# Altium PCB DRV8231_Breakout_Board.PcbDoc
Units mil, origin at the board's own origin, x right, y up, seen from the top; angles counter-clockwise.
Board outline 1302 x 1018 mil, 2 copper layers (Top Layer, Bottom Layer), stack 61.811 mil thick; 15 components, 14 nets, 59 pads, 66 vias.
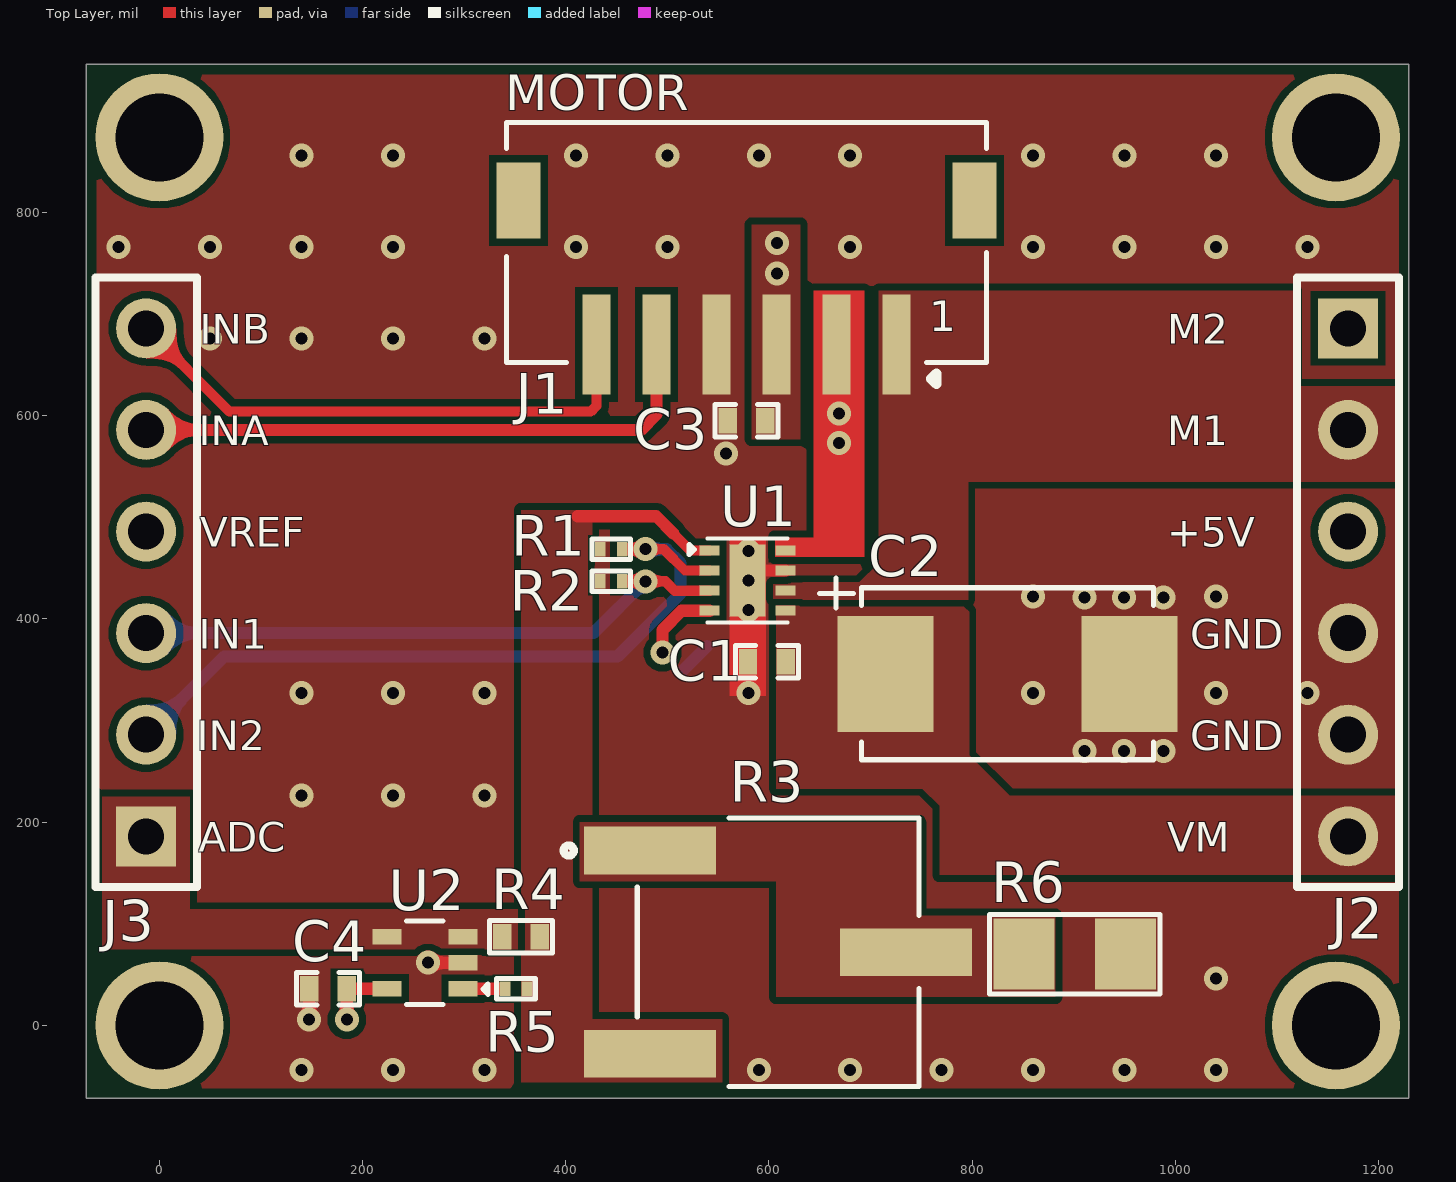
[diagram p0: Top Layer view]
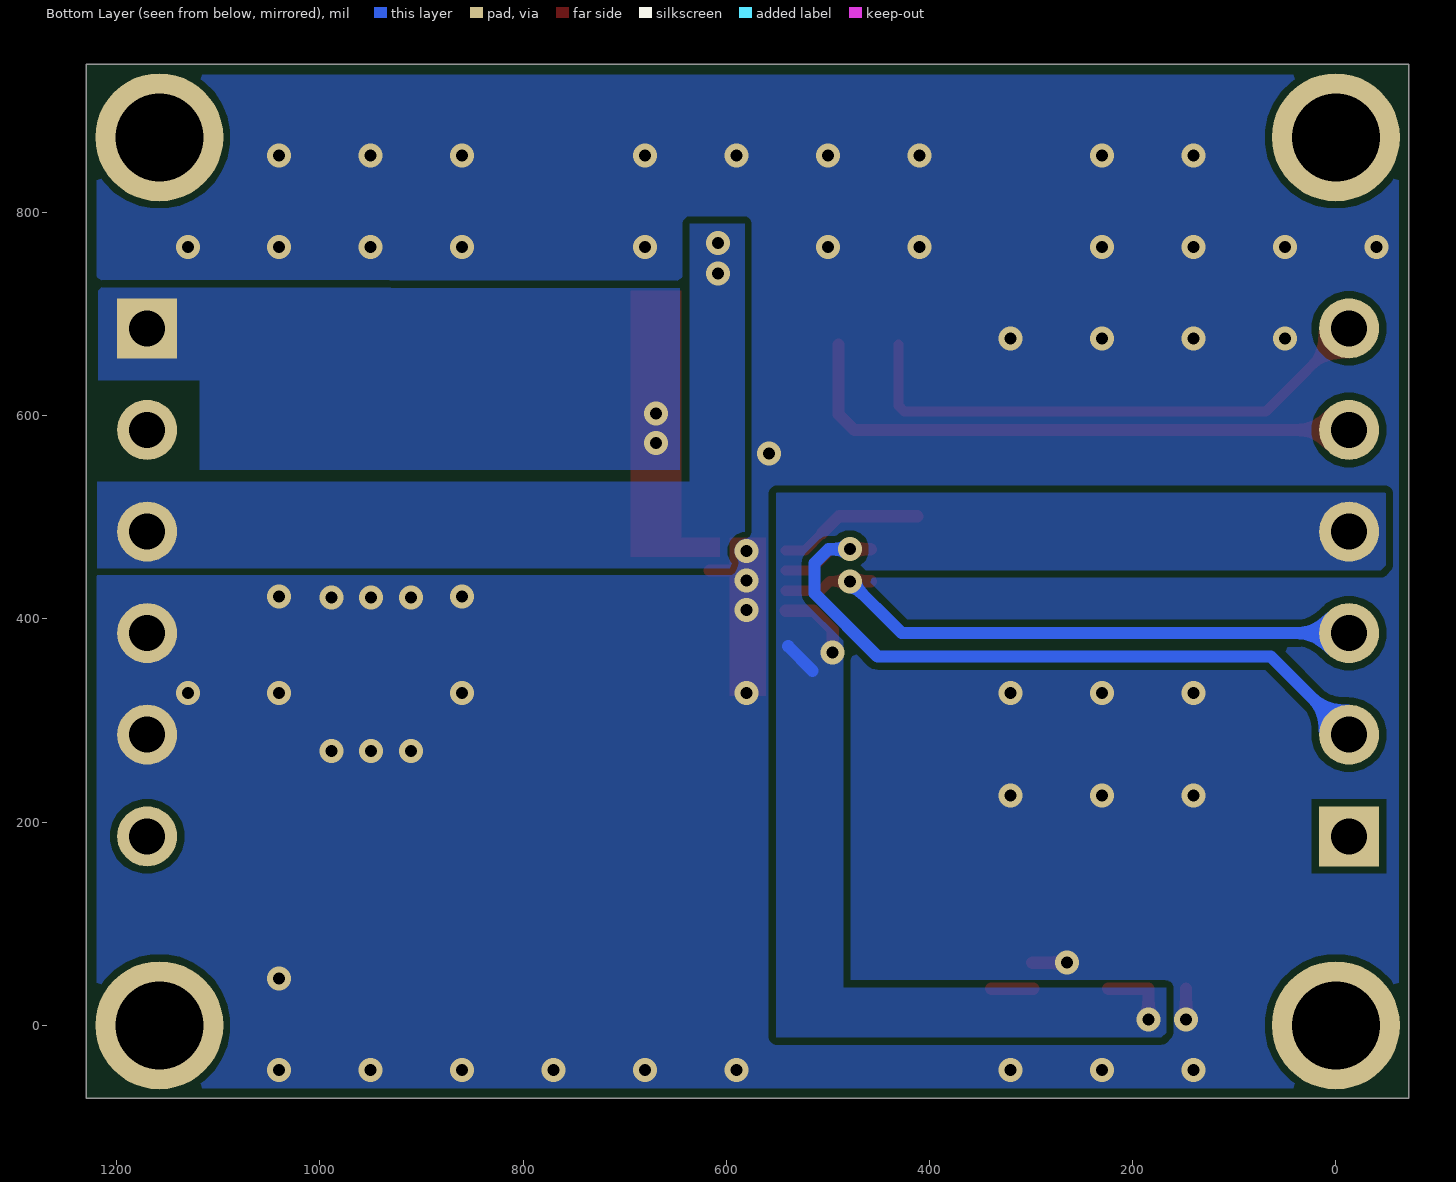
[diagram p1: Bottom Layer view, seen from below]
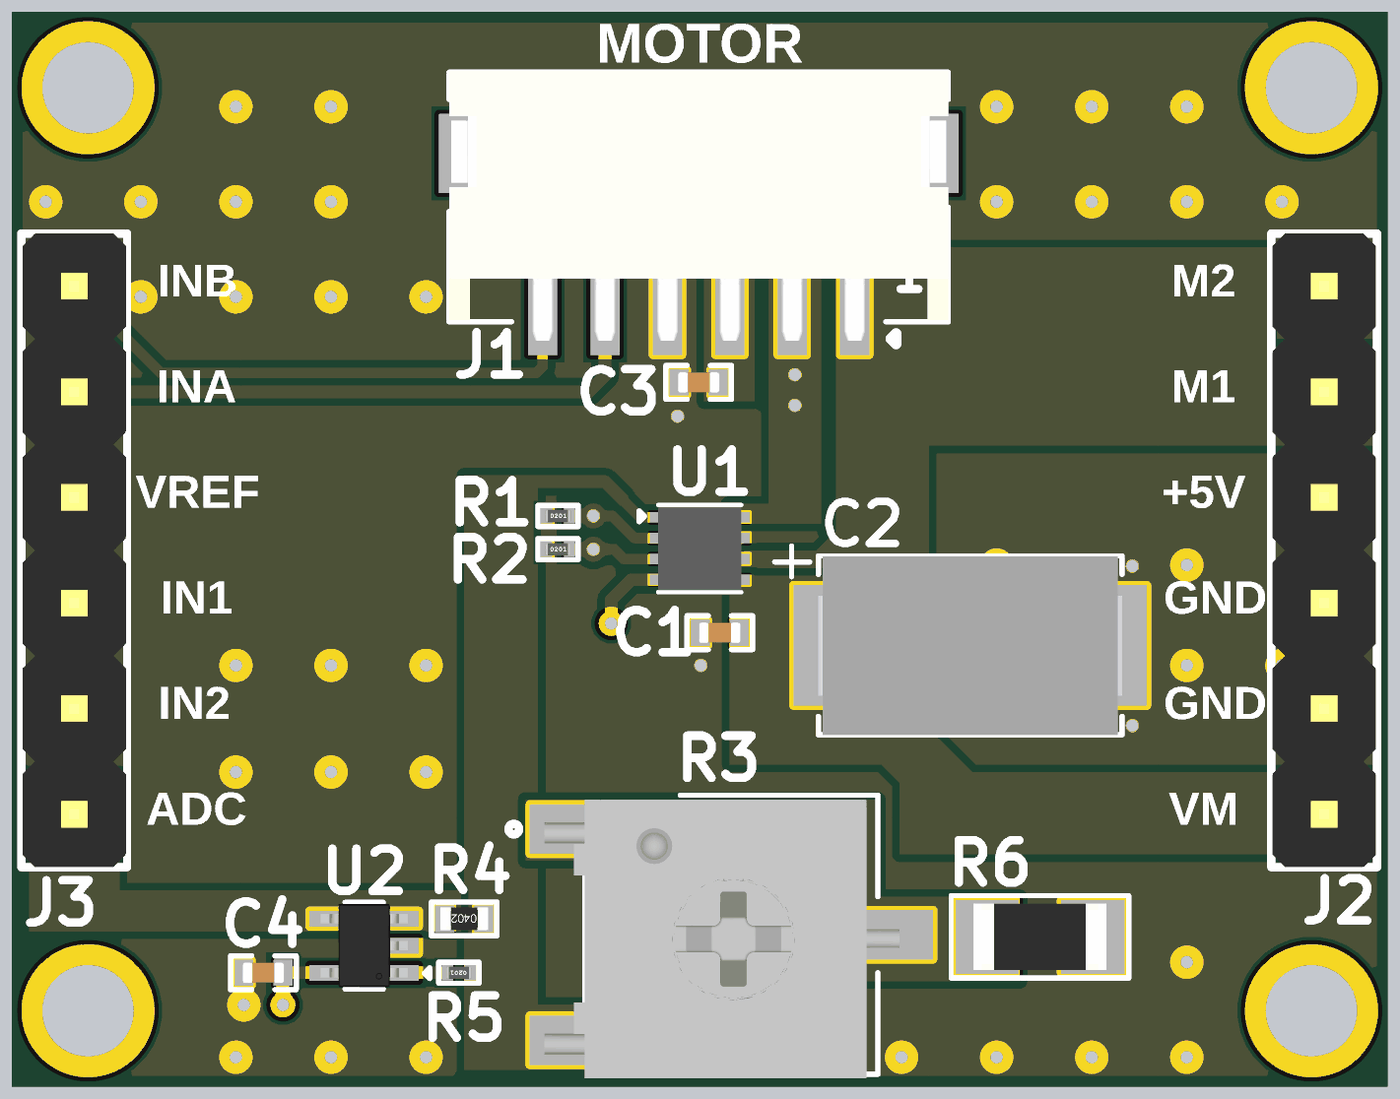
[diagram p2: 3D render of the assembled board from above, using the file's embedded part models]

## Layer stack, top to bottom
Top Solder: solder mask 0.394, Solder Resist, Dk 3.5
Top Layer: signal copper 1.378
Dielectric 1: dielectric 59.055, FR-4, Dk 4.8
Bottom Layer: signal copper 1.378
Bottom Solder: solder mask 0.394, Solder Resist, Dk 3.5

## Board outline
-72,-72 1230,-72 1230,946 -72,946

## Design rules (kind name [scope] priority, off if disabled: settings)
BoardOutlineClearance [All] p1: gap=0 ignorepadtopadclearanceinfootprint=FALSE except(10: Poly-OutlineEdge)
Clearance [All] p1: gap=7 ignorepadtopadclearanceinfootprint=FALSE except(0: Arc-Hole Track-Hole SMDPad-Hole THPad-Hole Via-Hole Fill-Hole Poly-Hole Region-Hole Text-Hole; 4: Arc-SMDPad Track-SMDPad SMDPad-SMDPad)
MinimumSolderMaskSliver [All] p1: minsoldermaskwidth=0
PolygonConnect [All] p1: connectstyle=Direct reliefconductorwidth=10 reliefentries=4 polygonreliefangle="90 Angle" airgapwidth=10
RoutingVias [All] p1: holewidth=11.81 width=23.62 viastyle="Through Hole" minholewidth=11.81 minwidth=23.62 maxholewidth=11.81 maxwidth=23.62
SilkToSilkClearance [All] p1: silktosilkclearance=0
SilkToSolderMaskClearance [IsPad] p1: minsilkscreentomaskgap=0 clearancetoexposedcopper=TRUE
SolderMaskExpansion [All] p1: expansion=4 istentingtop=FALSE
UnRoutedNet [All] p1: checkbadconnections=TRUE
Width [All] p1: maxlimit=100 minlimit=10 preferedwidth=22
26 further rules are at their usual default settings.

## Classes and differential pairs
component class Breakout: C1 C2 C3 J1 J2 J3 R1 R2 R4 R5 U1 U2

## Components (designator, comment, footprint, x,y, rotation, side; value= is the part's Value field where it differs from the comment)
C1 "0.1uf" Cap-0402 598,358 r0 top
C2 "47uF" Case-D 835,346 r0 top
C3 "0.1uf" Cap-0402 578,595 r0 top locked
C4 "0.1uf" Cap-0402 166,36 r0 top locked
J1 "S6B-ZR-SM4A-TF(LF)(SN)" S6B-ZR-SM4A-TF(LF)(SN) 578,741 r180 top locked
J2 "C37208" HDR1X6_ 1170,686 r270 top locked
J3 "C37208" HDR1X6_ -13,186 r90 top locked
R1 "100K" Res-0201 444.87,468.56 r0 top locked
R2 "100K" Res-0201 444.83,437 r0 top locked
R3 "5k" 3361P-1-502GLF 609,72 r0 top locked value=5kR
R4 "DNP" Res-0402 356,87 r180 top locked value=0R
R5 "4.7K" Res-0201 351,36 r180 top locked
R6 "720mR" Res-1206 901,70 r180 top locked
U1 "DRV8231ADSGR" WSON-8(2x2) 579,437.65 r0 top locked
U2 "TLV9001IDCKR" SC-70-5 261.4,61.59 r180 top locked

## Footprints (in the part's own frame and the unit in brackets; to place one, negate y for a bottom-side part, rotate by r counter-clockwise, add the part's x,y. Pads: shape width x height; smd on the part's side, far side on the other; paste and mask are expansions set on the pad)
3361P-1-502GLF [mm]
  rect 3.3x1.19 smd: 1(-3.2,2.54) 2(3.2,0) 3(-3.2,-2.54)
  silkscreen extent -5.36,-3.35 3.52,3.35, body extent -4.5,-3.46 4.04,3.25, height 5.23
Cap-0402 [mil]
  rect 18x25 smd mask+2.36: 1(-18.5,0) 2(18.5,0)
  silkscreen extent -31,-16 31,16, body extent -20,-10 20,10, height 19
Case-D [mm]
  rect 2.4x2.9 smd: 1(-3.05,0) 2(3.05,0)
  silkscreen extent -4.7,-2.15 3.65,2.39, body extent -3.65,-2.16 3.65,2.14, height 4
HDR1X6_ [mm] "Connector; Header; 6 Position"
  rect 1.5x1.5 hole 0.9: 1(0,0)
  round 1.5 hole 0.9: 2(2.54,0) 3(5.08,0) 4(7.62,0) 5(10.16,0) 6(12.7,0)
  silkscreen extent -1.27,-1.27 13.97,1.27, body extent -1.27,-1.24 13.97,1.25, height 8.54
Res-0201 [mm]
  rect 0.27x0.37 smd mask+0.055: 1(-0.275,0) 2(0.275,0)
  silkscreen extent -0.48,-0.25 0.48,0.25, body extent -0.3,-0.15 0.3,0.15, height 0.29
Res-0402 [mil]
  rect 18x25 smd mask+2.17: 1(-18.5,0) 2(18.5,0)
  silkscreen extent -32,-17 32,16, body extent -23,-11 23,11, height 16
Res-1206 [mil]
  rect 60x70 smd: 1(-50,0) 2(50,0)
  silkscreen extent -84,-39 84,39, body extent -63,-31 63,31, height 24
S6B-ZR-SM4A-TF(LF)(SN) [mm]
  rect 0.7x2.5 smd: 1(-3.75,1.8) 2(-2.25,1.8) 3(-0.75,1.8) 4(0.75,1.8) 5(2.25,1.8) 6(3.75,1.8)
  rect 1.1x1.9 smd: MP1(-5.7,-1.8) MP2(5.7,-1.8)
  silkscreen extent -6,-3.75 6,2.79, body extent -6,-3.79 6,2.71, height 3.7
SC-70-5 [mm]
  rect 0.73x0.38 smd: 1(-0.95,0.65) 2(-0.95,0) 3(-0.95,-0.65) 4(0.95,-0.65) 5(0.95,0.65)
  silkscreen extent -1.57,-1.04 0.46,1.04, body extent -1.05,-1 1.05,1, height 0.95
WSON-8(2x2) [mm]
  rect 0.5x0.25 smd paste+0 mask+0.051: 1(-0.949,0.751) 2(-0.951,0.252) 3(-0.95,-0.251) 4(-0.951,-0.751) 5(0.951,-0.751) 6(0.951,-0.249) 7(0.951,0.251) 8(0.951,0.75)
  rect 0.9x1.8 smd paste+0 mask+0.051: 9(0,0)
  silkscreen extent -1.46,-1.05 1,1.05, body extent -1,-1 1,1, height 0.77

## Part data
C1 C3 C4: library part GRM155R62A104KE14D, "CAP CER 0.1UF 100V X5R 0402", Capacitance=100nF, Case Code (Imperial)=0402, Case Code (Metric)=1005, Dielectric=X5R, LCSC Part Number=C162178, Manufacturer=Murata, Max Operating Temperature=85°C, Min Operating Temperature=-55°C, Package Quantity=10000, Tolerance=10%, Voltage Rating=100V, Case/Package=0402, Category="Ceramic Capacitors", ComponentLink1Description=http://www.farnell.com/datasheets/2079151.pdf?src-supplier=Farnell, ComponentLink1URL=http://www.farnell.com/datasheets/2079151.pdf?src-supplier=Farnell, ComponentLink2Description=http://www.mouser.com/ds/2/281/c02e-2905.pdf?src-supplier=Mouser, ComponentLink2URL=http://www.mouser.com/ds/2/281/c02e-2905.pdf?src-supplier=Mouser, ComponentLink3Description=http://www.farnell.com/datasheets/2079151.pdf?src-supplier=Element14, ComponentLink3URL=http://www.farnell.com/datasheets/2079151.pdf?src-supplier=Element14, ComponentLink4Description=http://search.murata.co.jp/Ceramy/image/img/A01X/G101/ENG/GRM155R62A104KE14-01.pdf?src-supplier=Digi-Key, ComponentLink4URL=http://search.murata.co.jp/Ceramy/image/img/A01X/G101/ENG/GRM155R62A104KE14-01.pdf?src-supplier=Digi-Key, ComponentLink5Description=http://www.farnell.com/datasheets/2079151.pdf?src-supplier=Newark, ComponentLink5URL=http://www.farnell.com/datasheets/2079151.pdf?src-supplier=Newark, Height=0.5mm, Item Type=Capacitor, Lead Free="Lead Free", Length=0.039inch, Manufacturer Part Number=GRM155R62A104KE14D, Mount="Surface Mount", Packaging="Tape and Reel", Pricing 1="10000=0.00500, 20000=0.00410, 30000=0.00390, 50000=0.00370, 100000=0.00300 (USD)", Reach SVHC Compliant=Yes, RoHS=Yes, RoHS Compliant=Yes, Series=GRM, Stock 1=870000, Supplier 1="Arrow Electronics", Supplier Part Number 1=GRM155R62A104KE14D, Termination=SMD/SMT, Thickness=0.022inch, Voltage Rating (DC)=100V, Weight=0.000212oz, Width=0.02inch
C2: library part CA45-D025K476T, "47uF 25V 0.9Ω@100kHz ±10% CASE-D-7343 Tantalum Capacitors ROHS", LCSC Part Number=C123267, Manufacturer="Hunan Xiangyee in S&T", Package=CASE-D-7343, ComponentLink1Description=LCSC, ComponentLink1URL=https://www.lcsc.com/product-detail/Tantalum-Capacitors_Hunan-Xiangyee-in-S-T-CA45-D025K476T_C123267.html, Item Type=Capacitor, Manufacturer Part Number=CA45-D025K476T
J1: "CONN HEADER SMD R/A 6POS 1.5MM", LCSC Part Number=C265070, Manufacturer=JST, Category="Headers and Wire Housings", ComponentLink1Description=https://datasheet.ciiva.com/26894/getdatasheetpartid-724069-26894934.pdf?src-supplier=Verical, ComponentLink1URL=https://datasheet.ciiva.com/26894/getdatasheetpartid-724069-26894934.pdf?src-supplier=Verical, ComponentLink2Description=https://datasheet.ciiva.com/26924/getdatasheetpartid-640743-26924052.pdf?src-supplier=Verical, ComponentLink2URL=https://datasheet.ciiva.com/26924/getdatasheetpartid-640743-26924052.pdf?src-supplier=Verical, Item Type="Wire To Board Connector", Manufacturer Part Number=S6B-ZR-SM4A-TF(LF)(SN), Pricing="1000=0.4135, 2000=0.3766, 5000=0.3642, 10000=0.3395, 25000=0.3272, 50000=0.327 (USD)", RoHS=Yes, Stock=49000, Supplier="Arrow Electronics", Supplier Part Number=S6B-ZR-SM4A-TF(LF)(SN)
J2 J3: "Straight 1 6 2.54mm Black Brass Plugin,P=2.54mm Pin Headers ROHS", Manufacturer=BOOMELEC, Package=Custom, ComponentLink1Description="New link", ComponentLink1URL=https://www.lcsc.com/product-detail/Pin-Headers_BOOMELE-Boom-Precision-Elec-C37208_C37208.html, Item Type=Header, LCSC Part Number=C37208, Manufacturer Part Number=C37208
R1 R2: library part RC0201JR-07100KL, "RES SMD 100K OHM 5% 1/20W 0201", Case Code (Imperial)=0201, Case Code (Metric)=0603, LCSC Part Number=C106230, Manufacturer=Yageo, Max Operating Temperature=125°C, Max Power Dissipation=50mW, Min Operating Temperature=-55°C, Package Quantity=1, Resistance=100kR, Resistance Tolerance=5%, Resistor Type="Thick Film", Temperature Coefficient=200ppm/°C, Voltage Rating=25V, Case/Package=0201, Category="Chip SMD Resistors", ComponentLink1Description=https://datasheet.ciiva.com/2462/pyu-r-int-thick-7-2462817.pdf?src-supplier=Digi-Key, ComponentLink1URL=https://datasheet.ciiva.com/2462/pyu-r-int-thick-7-2462817.pdf?src-supplier=Digi-Key, ComponentLink2Description=https://datasheet.ciiva.com/2462/pyu-r-int-thick-7-2462818.pdf?src-supplier=Digi-Key, ComponentLink2URL=https://datasheet.ciiva.com/2462/pyu-r-int-thick-7-2462818.pdf?src-supplier=Digi-Key, ComponentLink3Description=https://datasheet.ciiva.com/2462/pyu-r-int-thick-7-2462819.pdf?src-supplier=Digi-Key, ComponentLink3URL=https://datasheet.ciiva.com/2462/pyu-r-int-thick-7-2462819.pdf?src-supplier=Digi-Key, ComponentLink4Description=https://datasheet.ciiva.com/8888/pyu-rc0201-51-rohs-l-8-8888005.pdf?src-supplier=Avnet, ComponentLink4URL=https://datasheet.ciiva.com/8888/pyu-rc0201-51-rohs-l-8-8888005.pdf?src-supplier=Avnet, ComponentLink5Description=https://datasheet.ciiva.com/8896/pyu-rc0201-51-rohs-l-8-8896213.pdf?src-supplier=Avnet, ComponentLink5URL=https://datasheet.ciiva.com/8896/pyu-rc0201-51-rohs-l-8-8896213.pdf?src-supplier=Avnet, ComponentLink6Description=https://datasheet.ciiva.com/28395/pyu-rc0201-51-rohs-l-8-28395542.pdf?src-supplier=Avnet+Europe, ComponentLink6URL=https://datasheet.ciiva.com/28395/pyu-rc0201-51-rohs-l-8-28395542.pdf?src-supplier=Avnet+Europe, ComponentLink7Description=https://datasheet.ciiva.com/28639/1421516-28639863.pdf?src-supplier=Element14, ComponentLink7URL=https://datasheet.ciiva.com/28639/1421516-28639863.pdf?src-supplier=Element14, ComponentLink8Description=https://datasheet.ciiva.com/7672/1563626-7672249.pdf?src-supplier=Element14, ComponentLink8URL=https://datasheet.ciiva.com/7672/1563626-7672249.pdf?src-supplier=Element14, ComponentLink9Description=https://datasheet.ciiva.com/7672/1563626-7672250.pdf?src-supplier=Element14, ComponentLink9URL=https://datasheet.ciiva.com/7672/1563626-7672250.pdf?src-supplier=Element14, Construction=Rectangular, Contact Plating=Tin,Matte, Depth=0.3mm, Features="Moisture Resistant", Height=0.01inch, Lead Free="Lead Free", Length=0.6mm, Manufacturer Part Number=RC0201JR-07100KL, Military Standard=Not, Number of Terminations=2, Packaging="Tape and Reel", Power Rating=50mW, Pricing 1="1=0.09240, 10=0.09140, 25=0.05450, 10000=0.00340, 100000=0.00320, 1000000=0.00180, 5000000=0.00110 (USD)", Radiation Hardening=No, REACH SVHC="No SVHC", RoHS=Yes, RoHS Compliant=Yes, Series=RC, Size Code=0201, Stock 1=76, Supplier 1="Arrow Electronics", Supplier Part Number 1=RC0201JR-07100KL, Termination=SMD/SMT, Tolerance=5%, Voltage Rating (DC)=25V, Weight=6E-06oz, Width=0.012inch
R3: library part 3361P-1-502GLF, "Resistor Cermet Trimmer 5K Ohm 10% 1/2W 1(Elec)/1(Mech)Turn 2.77mm Gull Wing SMD Embossed T/R", Manufacturer=Bourns, Max Operating Temperature=125°C, Max Power Dissipation=500mW, Min Operating Temperature=-55°C, Package Quantity=1, Resistance Tolerance=10%, Resistor Type=Cermet, Supplier Part Number=3361P-502GLFCT-ND, Temperature Coefficient=100ppm/°C, Voltage Rating=300V, Category="Variable Resistors and Potentiometers", ComponentLink1Description=https://datasheet.ciiva.com/6197/1443095-6197504.pdf?src-supplier=Farnell, ComponentLink1URL=https://datasheet.ciiva.com/6197/1443095-6197504.pdf?src-supplier=Farnell, ComponentLink2Description=https://datasheet.ciiva.com/27056/2033666-27056369.pdf?src-supplier=Jameco, ComponentLink2URL=https://datasheet.ciiva.com/27056/2033666-27056369.pdf?src-supplier=Jameco, ComponentLink3Description=https://datasheet.ciiva.com/11833/0900766b80fe1d0c-11833209.pdf?src-supplier=Rs, ComponentLink3URL=https://datasheet.ciiva.com/11833/0900766b80fe1d0c-11833209.pdf?src-supplier=Rs, ComponentLink4Description=https://datasheet.ciiva.com/1477/1846252-1477777.pdf?src-supplier=Element14, ComponentLink4URL=https://datasheet.ciiva.com/1477/1846252-1477777.pdf?src-supplier=Element14, ComponentLink5Description=https://datasheet.ciiva.com/1477/1846252-1477776.pdf?src-supplier=Element14, ComponentLink5URL=https://datasheet.ciiva.com/1477/1846252-1477776.pdf?src-supplier=Element14, ComponentLink6Description=https://datasheet.ciiva.com/28666/1733537-28666333.pdf?src-supplier=Element14, ComponentLink6URL=https://datasheet.ciiva.com/28666/1733537-28666333.pdf?src-supplier=Element14, ComponentLink7Description=https://datasheet.ciiva.com/3266/3361-3266693.pdf?src-supplier=Avnet, ComponentLink7URL=https://datasheet.ciiva.com/3266/3361-3266693.pdf?src-supplier=Avnet, ComponentLink8Description=https://datasheet.ciiva.com/2156/3361-2156181.pdf?src-supplier=Digikey, ComponentLink8URL=https://datasheet.ciiva.com/2156/3361-2156181.pdf?src-supplier=Digikey, ComponentLink9Description=https://datasheet.ciiva.com/2156/3361-2156179.pdf?src-supplier=Digikey, ComponentLink9URL=https://datasheet.ciiva.com/2156/3361-2156179.pdf?src-supplier=Digikey, ComponentLink10Description=https://datasheet.ciiva.com/15225/getdatasheetpartid-162034-15225196.pdf?src-supplier=Verical, ComponentLink10URL=https://datasheet.ciiva.com/15225/getdatasheetpartid-162034-15225196.pdf?src-supplier=Verical, ComponentLink11Description=https://datasheet.ciiva.com/3266/3361-3266694.pdf?src-supplier=Avnet, ComponentLink11URL=https://datasheet.ciiva.com/3266/3361-3266694.pdf?src-supplier=Avnet, ComponentLink12Description=https://datasheet.ciiva.com/2156/3361-2156180.pdf?src-supplier=Digikey, ComponentLink12URL=https://datasheet.ciiva.com/2156/3361-2156180.pdf?src-supplier=Digikey, ComponentLink13Description=https://datasheet.ciiva.com/16716/70153632-16716878.pdf?src-supplier=Allied+Electronics, ComponentLink13URL=https://datasheet.ciiva.com/16716/70153632-16716878.pdf?src-supplier=Allied+Electronics, Depth=8.53mm, Height=0.192inch, Length=6.71mm, Manufacturer Part Number=3361P-1-502GLF, Military Standard=Not, Mounting Technology="Surface Mount", Number of Turns=1, Packaging="Tape and Reel", Power Rating=500mW, Pricing="1=1.27, 10=1.121, 25=1.0088, 50=0.9716, 100=0.9342, 250=0.8782 (USD)", Radiation Hardening=No, Reach SVHC Compliant=No, RoHS=Yes, RoHS Compliant=Yes, Series="Trimpot® 3361 - Sealed", Stock=12713, Supplier=Digikey, Taper=Linear, Technology=CERMET, Termination="Gull Wing", Tolerance=10%, Voltage Rating (DC)=300V, Weight=0.567g, Width=0.264inch
R4: library part AC0402FR-070RL, "RESISTOR 0402 JUMPER ZERO OHM", Case Code (Imperial)=0402, Case Code (Metric)=1005, LCSC Part Number=C226739, Manufacturer=Yageo, Max Operating Temperature=155°C, Min Operating Temperature=-55°C, Power Rating=62.5mW, Supplier Part Number=13-AC0402FR-070RLDKR-ND, Temperature Coefficient=200ppm/°C, Tolerance=1%, Voltage Rating=50V, Case/Package=0402, Category="Chip SMD Resistors", ComponentLink1Description=https://datasheet.ciiva.com/12656/pyu-ac-51-rohs-l-2-12656734.pdf?src-supplier=Mouser, ComponentLink1URL=https://datasheet.ciiva.com/12656/pyu-ac-51-rohs-l-2-12656734.pdf?src-supplier=Mouser, ComponentLink2Description=LCSC, ComponentLink2URL=https://www.lcsc.com/product-detail/Chip-Resistor-Surface-Mount_YAGEO-AC0402FR-070RL_C226739.html, Height=370um, Item Type=Resistor, Manufacturer Part Number=AC0402FR-070RL, Packaging="Tape and Reel", Pricing="1=0.1, 10=0.017, 25=0.0132, 50=0.01, 100=0.0071, 250=0.00568, 500=0.00454, 1000=0.00335, 5000=0.0024 (USD)", RoHS=Yes, Series=AC, Stock=337140, Supplier=Digi-Key, Termination=SMD/SMT
R5: library part RC0201FR-074K7L, "RES 4.7K OHM 1% 1/20W 0201", LCSC Part Number=C138135, Manufacturer=Yageo, Supplier Part Number=7537285, Category="Chip SMD Resistors", ComponentLink1Description=https://datasheet.ciiva.com/2493/pyu-r-int-thick-7-2493811.pdf?src-supplier=Digi-Key, ComponentLink1URL=https://datasheet.ciiva.com/2493/pyu-r-int-thick-7-2493811.pdf?src-supplier=Digi-Key, ComponentLink2Description=https://datasheet.ciiva.com/2493/pyu-r-int-thick-7-2493812.pdf?src-supplier=Digi-Key, ComponentLink2URL=https://datasheet.ciiva.com/2493/pyu-r-int-thick-7-2493812.pdf?src-supplier=Digi-Key, ComponentLink3Description=https://datasheet.ciiva.com/2493/pyu-r-int-thick-7-2493813.pdf?src-supplier=Digi-Key, ComponentLink3URL=https://datasheet.ciiva.com/2493/pyu-r-int-thick-7-2493813.pdf?src-supplier=Digi-Key, ComponentLink4Description=https://datasheet.ciiva.com/8892/pyu-rc0201-51-rohs-l-8-8892942.pdf?src-supplier=Avnet, ComponentLink4URL=https://datasheet.ciiva.com/8892/pyu-rc0201-51-rohs-l-8-8892942.pdf?src-supplier=Avnet, ComponentLink5Description=https://datasheet.ciiva.com/7672/1563626-7672233.pdf?src-supplier=Element14, ComponentLink5URL=https://datasheet.ciiva.com/7672/1563626-7672233.pdf?src-supplier=Element14, Item Type=Resistor, Manufacturer Part Number=RC0201FR-074K7L, Pricing="10000=0.0014, 50000=0.0013, 250000=0.0013, 750000=0.0012, 2000000=0.0011 (USD)", RoHS=Yes, Stock=1610000, Supplier="Future Electronics"
R6: library part CR1206FR720P05R, "250mW 720mΩ ±600ppm/℃ ±1% 1206 Current Sense Resistors/Shunt Resistors ROHS", LCSC Part Number=C175810, Manufacturer="Ever Ohms Tech", Package=1206, ComponentLink1Description=LCSC, ComponentLink1URL=https://www.lcsc.com/product-detail/Current-Sense-Resistors-Shunt-Resistors_Ever-Ohms-Tech-CR1206FR720P05R_C175810.html, Item Type=Resistor, Manufacturer Part Number=CR1206FR720P05R
U1: "33V H BRIDGE MOTOR DRIVER WITH C", LCSC Part Number=C5139865, Manufacturer="Texas Instruments", Supplier Part Number=595-DRV8231ADSGR, Height=800um, Item Type=IC, Length=2mm, Manufacturer Part Number=DRV8231ADSGR, Number of Channels=1NUMBER, Pins=8NUMBER, Pricing="1=1.52, 10=1.29, 50=1.29, 100=1.1, 1000=0.747, 10000=0.657 (USD)", RoHS=No, Stock=8609, Supplier=Mouser, Thickness=750um, Width=2mm
U2: "IC CMOS 1 CIRCUIT SC70-5", Input Bias Current=5pA, Input Offset Voltage (Vos)=400uV, LCSC Part Number=C398362, Manufacturer="Texas Instruments", Max Operating Temperature=125°C, Min Operating Temperature=-40°C, Operating Supply Current=60uA, Output Current per Channel=40mA, Supplier Part Number=595-TLV9001IDCKR, ComponentLink1Description=http://www.ti.com/lit/ds/symlink/tlv9001.pdf?src-supplier=Digikey, ComponentLink1URL=http://www.ti.com/lit/ds/symlink/tlv9001.pdf?src-supplier=Digikey, Gain Bandwidth Product=1MHz, Item Type=IC, Manufacturer Part Number=TLV9001IDCKR, Mounting Technology="Surface Mount", Number of Channels=1, Number of Circuits=1, Packaging="Cut Tape", Pricing="1=0.47, 10=0.348, 50=0.348, 100=0.194, 1000=0.146, 10000=0.117 (USD)", RoHS=Yes, RoHS Compliant=Yes, Series=-, Slew Rate=2V/µs, Stock=13115, Supplier=Mouser

## Free pads (board coordinates)
  round 125.98 hole 86.61: MH(0,874) MH(0,0) MH(1158,874) MH(1158,0)

## Via types
v1: diameter 23.62, hole 11.81, Top Layer to Bottom Layer, 66 vias

## Nets (pads, with @x,y where several pads share a name; then routed paths per layer and width w, separated by ;. In a path a pad name is that pad's centre, name@x,y a point inside that pad or via, vN(x,y) a via of type N, cw(c..) or ccw(c..) an arc to the next point about the centre after c; other vN are vias at no path point)
+5V: C3.2 J1.3 J2.3
  other v1: 608,740 608,770
ADC: J3.1 R4.2 U2.3 U2.4
GND: C1.1 C2.2 C3.1 C4.1 J1.4 J2.4 J2.5 R1.1 R2.1 R6.1 U1.7 U1.9 U2.2 | length 106.4
  Top Layer w12: v1(147.5,5.5) C4.1 ; v1(264.41,61.59) U2.2 ; U1.9 588.88,447.53 U1.7
  other v1: 140,-44 230,-44 320,-44 590,-44 680,-44 770,-44 860,-44 950,-44 1040,-44 1040,46 140,226 230,226 320,226 910.5,270 949.5,270 988.5,270 140,327 230,327 320,327 580,327 860,327 1040,327 1130,327 580,409 910.5,421 949.5,421 988.5,421 860,422 1040,422 580,438 580,467 558,563 50,676 140,676 230,676 320,676 -40,766 50,766 140,766 230,766 410,766 500,766 680,766 860,766 950,766 1040,766 1130,766 140,856 230,856 410,856 500,856 590,856 680,856 860,856 950,856 1040,856
I_SENSE: R3.3 R4.1 R5.1 U1.1 | length 143.8
  Top Layer w10: 505.89,484.11 522.77,467.23 U1.1
  Top Layer w12: 411.83,501 489,501 505.89,484.11
IN1: J3.3 R2.2 U1.3 | length 602.2
  Top Layer w10: v1(478.33,437) 498,437 507.22,427.78 U1.3
  Top Layer w12: R2.2@457.65,437 v1@480.33,437
  Bottom Layer w12: J3.3 427.33,386 v1(478.33,437)
IN2: J3.2 R1.2 U1.2 | length 746.4
  Top Layer w10: v1(478.37,468.56) 496.44,468.56 517.44,447.56 U1.2
  Top Layer w12: R1.2@457.7,468.56 v1(478.37,468.56)
  Bottom Layer w12: J3.2 64,363 451,363 513,425 513,455 499.44,468.56 v1(478.37,468.56)
INA: J1.5 J3.5 | length 577.5
  Top Layer w12: J3.5 474,586 489.42,601.42 J1.5
INB: J1.6 J3.6 | length 540
  Top Layer w10: J3.6 69,604 424.5,604 430.36,609.86 J1.6
M1: J1.1 J2.2 U1.6
M2: J1.2 J2.1 U1.8 | length 29
  Top Layer w40: v1(669.11,573.27) v1(669.11,602.27)
NetR3_1: R3.1 R3.2 R6.2
NetR5_2: R5.2 U2.1 | length 41.4
  Top Layer w12: U2.1@297.8,36 R5.2@339.17,36
VM: C1.2 C2.1 J2.6 U1.5
VREF: C4.2 J3.4 U1.4 U2.5 | length 180.6
  Top Layer w12: v1(184.5,5.5) C4.2 U2.5 ; v1(495.19,366.74) 495.19,389.19 514.09,408.09 U1.4
  Bottom Layer w12: 515,349 539,373
pads on no net: J1.MP1 J1.MP2

## Polygon pours and split planes (outlines as drawn)
VM on Top Layer "VM_L01_P021" (solid, remove dead copper, pour order 21): 751,233 768,216 768,148 1216,148 1216,226 837,226 797,266 797,413 607,413 607,233
GND on Top Layer "GND_L01_P015" (solid, remove dead copper, pour order 15): -72,-72 1230,-72 1230,946 -72,946
I_SENSE on Top Layer "I_SENSE_L01_P019" (solid, remove dead copper, pour order 19): 356,507 356,-55.88 459.38,-55.88 554,-55.88 554,6 426,6 426,507
ADC on Top Layer "ADC_L01_P018" (solid, remove dead copper, pour order 18): -56,75 -56,225 30,225 30,114 353,114 353,75
NetR3_1 on Top Layer "NETR3_1_L01_P011" (solid, remove dead copper, pour order 11): 748,200 748,108.02 881.41,108.02 882,108.62 882,28 607,28 607,142 414,142 414,200
M1 on Top Layer "M1_L01_P001" (solid, remove dead copper, pour order 1): 796,419 796,535 1217,535 1217,629 1118,629 1118,723 708,723 708,535 708,455 689,436 604,436 604,419
+5V on Top Layer "+5V_L01_P006" (solid, remove dead copper, pour order 6): 631,788 583,788 583,577 631,577
GND on Bottom Layer "GND_L02_P014" (solid, remove dead copper, pour order 14): -72,-72 1230,-72 1230,946 -72,946
VREF on Bottom Layer "VREF_L02_P020" (solid, remove dead copper, pour order 20): -49,524 -49,448 496.88,448 487,438.12 485,417 485,37 167,37 167,-12 559,-12 559,524
M2 on Bottom Layer "M2_L02_P017" (solid, remove dead copper, pour order 17): 646,725.5 646,547 1118,547 1118,635 1218,635 1218,726.5
+5V on Bottom Layer "+5V_L02_P013" (solid, remove dead copper, pour order 13): 1219,535 636,535 636,789 582,789 582,450 1219,450

## Other copper
Top Layer:
  rectangle net GND: 561,324 597,480
  rectangle net M2: 606,461 694,480
  rectangle net M2: 644,464 694,723

## Silkscreen, mask and mechanical layers (free items; w line width, h text height)
Top Overlay:
  text "MOTOR" at 340.6,889 h60
  text "INB" at 40,661 h50
  text "M2" at 992.21,661 h50
  text "INA" at 39,561 h50
  text "M1" at 992.21,561 h50
  text "VREF" at 40.21,461 h50
  text "+5V" at 992.21,461 h50
  text "IN1" at 39,361 h50
  text "GND" at 1014.46,361 h50
  text "IN2" at 37,261 h50
  text "GND" at 1014.46,261 h50
  text "ADC" at 39,161 h50
  text "VM" at 992.21,161 h50
Board_Outline:
  lines w10: -72,-72 -72,946 1230,946 1230,-72 -72,-72 ; 1230,437 1230,437
Fabrication Info:
  drawing of 191 lines, arcs and shapes, not listed
  text "Layer" at 1693.74,313 h60
  text "Name" at 2103.65,313 h60
  text "Material" at 3033.4,313 h60
  text "Thickness" at 3893.16,313 h60
  text "Constant" at 4543,313 h60
  text "Board Layer Stack" at 5112.86,313 h60
  text "Top Overlay" at 2103.65,193 h60
  text "Top Solder" at 2103.65,73 h60
  text "Solder Resist" at 3033.4,73 h60
  text "0.39mil" at 3893.16,73 h60
  text "3.5" at 4543,73 h60
  text "1" at 1693.74,-47 h60
  text "Top Layer" at 2103.65,-47 h60
  text "1.38mil" at 3893.16,-47 h60
  text "Dielectric 1" at 2103.65,-167 h60
  text "FR-4" at 3033.4,-167 h60
  text "59.06mil" at 3893.16,-167 h60
  text "4.8" at 4543,-167 h60
  text "2" at 1693.74,-287 h60
  text "Bottom Layer" at 2103.65,-287 h60
  text "1.38mil" at 3893.16,-287 h60
  text "Bottom Solder" at 2103.65,-407 h60
  text "Solder Resist" at 3033.4,-407 h60
  text "0.39mil" at 3893.16,-407 h60
  text "3.5" at 4543,-407 h60
  text "Bottom Overlay" at 2103.65,-527 h60
  text "Total board thickness:" at 1693.74,-647 h60
  text "62.60mil" at 3893.16,-647 h60
Drill Drawing:
  circle w10: c1703.83,1089.33 r33.33
  lines w10: 1670.5,922.67 1687.17,922.67 1703.83,906 1720.5,922.67 1737.17,922.67 1720.5,939.33 1737.17,956 1720.5,956 1703.83,972.67 1687.17,956 1670.5,956 1687.17,939.33 1670.5,922.67 ; 1670.5,1206 1737.17,1206 1737.17,1272.67 1670.5,1272.67 1670.5,1206
  lines w15: 1610.71,861 8570.83,861 ; 1610.71,1311 8570.83,1311 ; 2161.58,711 2161.58,1461 ; 2701.44,711 2701.44,1461 ; 3801.12,711 3801.12,1461 ; 4307,711 4307,1461 ; 5040.8,711 5040.8,1461 ; 6540.35,711 6540.35,1461 ; 7130.2,711 7130.2,1461 ; 7876,711 7876,1461 ; 1610.71,711 8570.83,711 8570.83,1461 1610.71,1461 1610.71,711
  text "Symbol" at 1700.71,1356 h72
  text "Count" at 2206.58,1356 h72
  text "Hole Size" at 2746.44,1356 h72
  text "Plated" at 3846.12,1356 h72
  text "Hole Type" at 4352,1356 h72
  text "Drill Layer Pair" at 5085.8,1356 h72
  text "Via/Pad" at 6585.35,1356 h72
  text "Pad Shape" at 7175.2,1356 h72
  text "Template" at 7921,1356 h72
  text "66" at 2206.58,1206 h60
  text "11.81mil (0.300mm)" at 2746.44,1206 h60
  text "PTH" at 3846.12,1206 h60
  text "Round" at 4352,1206 h60
  text "Top Layer - Bottom Layer" at 5085.8,1206 h60
  text "Via" at 6585.35,1206 h60
  text "Rounded" at 7175.2,1206 h60
  text "(Mixed)" at 7921,1206 h60
  text "12" at 2206.58,1056 h60
  text "35.43mil (0.900mm)" at 2746.44,1056 h60
  text "PTH" at 3846.12,1056 h60
  text "Round" at 4352,1056 h60
  text "Top Layer - Bottom Layer" at 5085.8,1056 h60
  text "Pad" at 6585.35,1056 h60
  text "(Mixed)" at 7175.2,1056 h60
  text "(Mixed)" at 7921,1056 h60
  text "4" at 2206.58,906 h60
  text "86.61mil (2.200mm)" at 2746.44,906 h60
  text "PTH" at 3846.12,906 h60
  text "Round" at 4352,906 h60
  text "Top Layer - Bottom Layer" at 5085.8,906 h60
  text "Pad" at 6585.35,906 h60
  text "Rounded" at 7175.2,906 h60
  text "c320h220" at 7921,906 h60
  text "82 Total" at 2206.58,756 h60

## Dimensions
1230,946 to 1230,-72 on Dimension
-72,946 to 1230,946 on Dimension

## Text inside footprints (layer, text, board x,y; h text height)
J1: Top Overlay "1" at 758,683 h30